# Altium PCB RPi-B-HAT (65 x 56 mm).PcbDoc
Units mm, origin at the board's own origin, x right, y up, seen from the top; angles counter-clockwise.
Board outline 65 x 56 mm, 2 copper layers (Top Layer, Bottom Layer); 8 components, 0 nets, 76 pads, 0 vias.
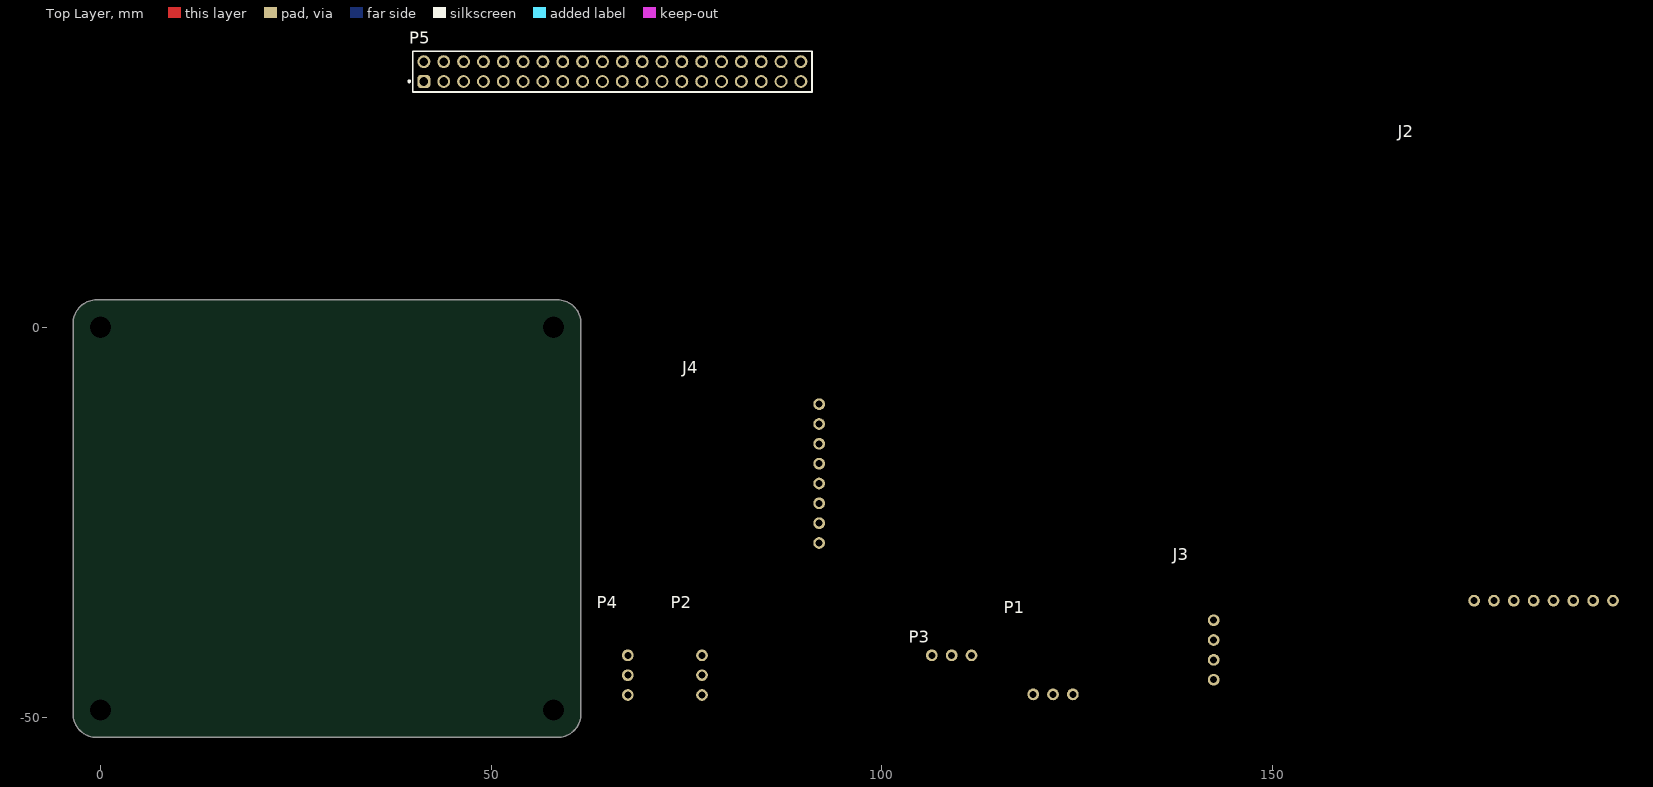
[diagram p0: Top Layer view]
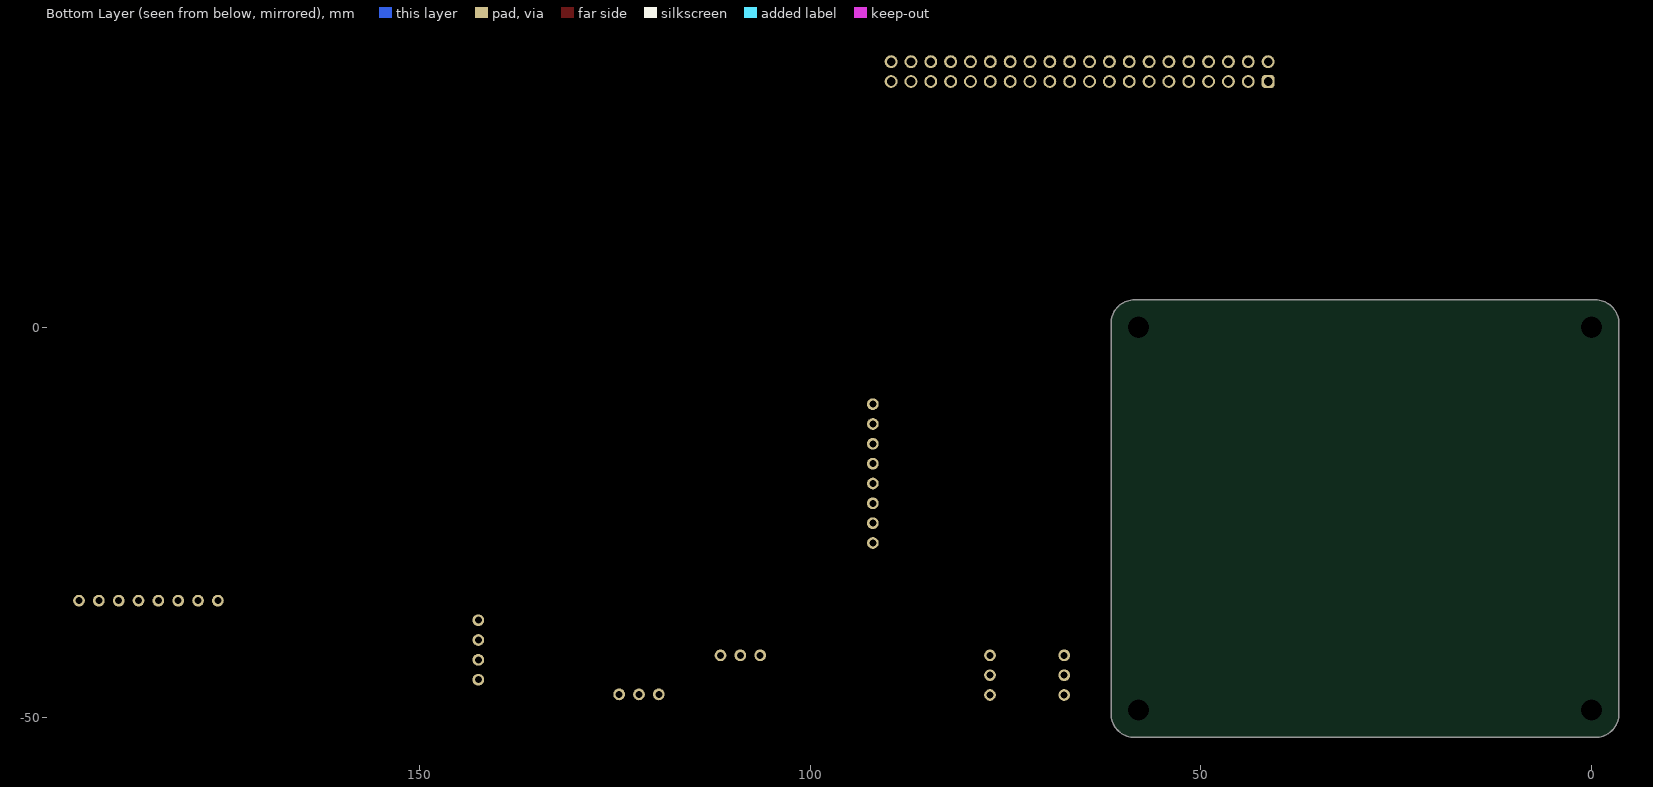
[diagram p1: Bottom Layer view, seen from below]

## Layer stack, top to bottom
Top Solder: solder mask 0.0102, Solder Resist, Dk 3.5
Top Layer: signal copper 0.0356
Dielectric 1: dielectric 0.32, FR-4, Dk 4.8
Bottom Layer: signal copper 0.0356
Bottom Solder: solder mask 0.0102, Solder Resist, Dk 3.5

## Board outline
-3.5,-49.5 ccw(c-0.5,-49.5) -0.5,-52.5 58.5,-52.5 ccw(c58.5,-49.5) 61.5,-49.5 61.5,0.5 ccw(c58.5,0.5) 58.5,3.5 -0.5,3.5 ccw(c-0.5,0.5) -3.5,0.5

## Design rules (kind name [scope] priority, off if disabled: settings)
Clearance [All] p1: gap=0.254 ignorepadtopadclearanceinfootprint=FALSE except(0: Arc-Hole Track-Hole SMDPad-Hole THPad-Hole Via-Hole Fill-Hole Poly-Hole Region-Hole Text-Hole)
PolygonConnect [All] p1: connectstyle=Relief reliefconductorwidth=0.254 reliefentries=4 polygonreliefangle="90 Angle" airgapwidth=0.254
RoutingVias [All] p1: holewidth=0.711 width=1.27 viastyle="Through Hole" minholewidth=0.711 minwidth=1.27 maxholewidth=0.711 maxwidth=1.27
SolderMaskExpansion [All] p1: expansion=0.102 istentingtop=FALSE
Width [All] p1: maxlimit=0.254 minlimit=0.254 preferedwidth=0.254
30 further rules are at their usual default settings.

## Components (designator, comment, footprint, x,y, rotation, side; value= is the part's Value field where it differs from the comment)
J2 "530470810" SPI 1001.34,-27.38 r0 top
J3 "Traffic light" "Traffic light" 142.5,-37.5 r90 top
J4 "ENS160+AHT21" ENS160+AHT21 92,-20 r90 top
P1 "BUZZER" BUZZER 157.5,-47 r0 top
P2 "BUTTON" Button 77,-42 r90 top
P3 "53047-0310" SR505 111.5,-42 r0 top
P4 "BUTTON" Button2 67.5,-42 r90 top
P5 "61304021121" 61304021121 65.53,32.73 r0 top

## Footprints (in the part's own frame and the unit in brackets; to place one, negate y for a bottom-side part, rotate by r counter-clockwise, add the part's x,y. Pads: shape width x height; smd on the part's side, far side on the other; paste and mask are expansions set on the pad)
61304021121 [mm] "Pin Header, pitch 2.54 mm, THT, Vertical, dual row, 40p"
  rrect50% 1.65x1.65 hole 1.1: 1(-24.13,-1.27)
  round 1.65 hole 1.1: 2(-24.13,1.27) 3(-21.59,-1.27) 4(-21.59,1.27) 5(-19.05,-1.27) 6(-19.05,1.27) 7(-16.51,-1.27) 8(-16.51,1.27) 9(-13.97,-1.27) 10(-13.97,1.27) 11(-11.43,-1.27) 12(-11.43,1.27) 13(-8.89,-1.27) 14(-8.89,1.27) 15(-6.35,-1.27) 16(-6.35,1.27) 17(-3.81,-1.27) 18(-3.81,1.27) 19(-1.27,-1.27) 20(-1.27,1.27) 21(1.27,-1.27) 22(1.27,1.27) 23(3.81,-1.27) 24(3.81,1.27) 25(6.35,-1.27) 26(6.35,1.27) 27(8.89,-1.27) 28(8.89,1.27) 29(11.43,-1.27) 30(11.43,1.27) 31(13.97,-1.27) 32(13.97,1.27) 33(16.51,-1.27) 34(16.51,1.27) 35(19.05,-1.27) 36(19.05,1.27) 37(21.59,-1.27) 38(21.59,1.27) 39(24.13,-1.27) 40(24.13,1.27)
  silkscreen extent -26.13,-2.62 25.55,2.62, body extent -25.4,-2.54 25.4,2.54, height 8.59
Button [mm]
  round 1.5 hole 0.9: 41(-5.08,0) 42(-2.54,0) 43(0,0)
  body extent -10.26,-4.23 5.24,4.27, height 17.86
Button2 [mm]
  round 1.5 hole 0.9: 44(-5.08,0) 45(-2.54,0) 46(0,0)
  body extent -10.26,-4.23 5.24,4.27, height 17.86
BUZZER [mm]
  round 1.5 hole 0.9: 1(-38.1,0) 2(-35.56,0) 3(-33.02,0)
  body extent -42.11,-5.37 -29.01,9.63, height 29.97
ENS160+AHT21 [mm]
  round 1.5 hole 0.9: 1(-7.62,0) 2(-5.08,0) 3(-2.54,0) 4(0,0) 5(2.54,0) 6(5.08,0) 7(7.62,0) 8(10.16,0)
  body extent -10.67,-1.55 13.33,17.75, height 2.44
SPI [mm]
  round 1.5 hole 0.9: 1(-825.5,-7.62) 2(-822.96,-7.62) 3(-820.42,-7.62) 4(-817.88,-7.62) 5(-815.34,-7.62) 6(-812.8,-7.62) 7(-810.26,-7.62) 8(-807.72,-7.62)
  body extent -835.53,-9.05 -796.42,50.96, height 4.96
SR505 [mm]
  round 1.5 hole 0.9: 1(-5.08,0) 2(-2.54,0) 3(0,0)
  body extent -8.27,-10.28 2.93,0.88, height 32.86
"Traffic light" [mm]
  round 1.5 hole 0.9: 1(-7.62,0) 2(-5.08,0) 3(-2.54,0) 4(0,0)
  body extent -14.65,-7.78 6.93,5.51, height 55.4

## Part data
J2 J4: Package=None, Availability=Unavailable, MP=530470810, Price=None
J3: "2.50mm Pitch SPOXâ„¢ Wire-to-Board Header, Vertical, Shrouded, 4 Circuits, Tin (Sn) Plating", Package=None, Check_prices=https://www.snapeda.com/parts/22035045/Molex/view-part/?ref=eda, MF=Molex, MP=22035045, SnapEDA_Link=https://www.snapeda.com/parts/22035045/Molex/view-part/?ref=snap
P1 P2 P3 P4: "Connector Header Through Hole 3 position 0.049 (1.25mm)", Package=None, Availability="In Stock", Check_prices=https://www.snapeda.com/parts/53047-0310/Molex/view-part/?ref=eda, MF=Molex, MP=53047-0310, Price=None, SnapEDA_Link=https://www.snapeda.com/parts/53047-0310/Molex/view-part/?ref=snap
P5: library part CMP-1502-01135-4, "WR-PHD Straight Male, PCB Header, Through Hole, 2 Rows, 40 Contacts, 2.54mm Pitch", Color=Black, Contact Resistance=20mΩ, Current Rating=3A, Max Operating Temperature=105°C, Min Operating Temperature=-40°C, Operating Supply Voltage=250V, Connector Type="Male Pin", Contact Material=Gold, Contact Mating Length=5.9944mm, Contact Plating=Gold, Gender=Male, Height=8.89mm, Lead Pitch=2.54mm, Mount="Through Hole", Number of Contacts=40, Number of Pins=40, Number of Positions=40, Number of Rows=2, Orientation=Vertical, Packaging=Bulk, Pitch=2.54mm, RoHS=Compliant, Row Spacing=2.54mm, Termination=Solder, Voltage Rating=250V

## Free pads (board coordinates)
  round 0 hole 2.7: 2(0,-49) 2(0,0) 2(58,-49) 2(58,0)

## Nets (pads, with @x,y where several pads share a name; then routed paths per layer and width w, separated by ;. In a path a pad name is that pad's centre, name@x,y a point inside that pad or via, vN(x,y) a via of type N, cw(c..) or ccw(c..) an arc to the next point about the centre after c; other vN are vias at no path point)
pads on no net: J2.1 J2.2 J2.3 J2.4 J2.5 J2.6 J2.7 J2.8 J3.1 J3.2 J3.3 J3.4 J4.1 J4.2 J4.3 J4.4 J4.5 J4.6 J4.7 J4.8 P1.1 P1.2 P1.3 P2.41 P2.42 P2.43 P3.1 P3.2 P3.3 P4.44 P4.45 P4.46 P5.1 P5.2 P5.3 P5.4 P5.5 P5.6 P5.7 P5.8 P5.9 P5.10 P5.11 P5.12 P5.13 P5.14 P5.15 P5.16 P5.17 P5.18 P5.19 P5.20 P5.21 P5.22 P5.23 P5.24 P5.25 P5.26 P5.27 P5.28 P5.29 P5.30 P5.31 P5.32 P5.33 P5.34 P5.35 P5.36 P5.37 P5.38 P5.39 P5.40

## Other copper
Top Layer:
  pour cut-out: 0,-52.5 cw(c0,-49) -3.5,-49 cw(c0,-49) 0,-45.5 cw(c0,-49) 3.5,-49 cw(c0,-49)
  pour cut-out: 58,-52.5 cw(c58,-49) 54.5,-49 cw(c58,-49) 58,-45.5 cw(c58,-49) 61.5,-49 cw(c58,-49)
  pour cut-out: 58,-3.5 cw(c58,0) 54.5,0 cw(c58,0) 58,3.5 cw(c58,0) 61.5,0 cw(c58,0)
  pour cut-out: 0,-3.5 cw(c0,0) -3.5,0 cw(c0,0) 0,3.5 cw(c0,0) 3.5,0 cw(c0,0)
Bottom Layer:
  pour cut-out: 0,-52.5 cw(c0,-49) -3.5,-49 cw(c0,-49) 0,-45.5 cw(c0,-49) 3.5,-49 cw(c0,-49)
  pour cut-out: 58,-52.5 cw(c58,-49) 54.5,-49 cw(c58,-49) 58,-45.5 cw(c58,-49) 61.5,-49 cw(c58,-49)
  pour cut-out: 58,-3.5 cw(c58,0) 54.5,0 cw(c58,0) 58,3.5 cw(c58,0) 61.5,0 cw(c58,0)
  pour cut-out: 0,-3.5 cw(c0,0) -3.5,0 cw(c0,0) 0,3.5 cw(c0,0) 3.5,0 cw(c0,0)

## Silkscreen, mask and mechanical layers (free items; w line width, h text height)
Top Solder:
  drawing of 16 lines, arcs and shapes, not listed
Bottom Solder:
  circle w0.254: c0,-49 r2.5
  circle w0.254: c58,-49 r2.5
  circle w0.254: c58,0 r2.5
  circle w0.254: c0,0 r2.5
  region: 60.55,0 60.3,-1 59.75,-1.8 59,-2.3 58.05,-2.5 57,-2.3 56.25,-1.8 55.7,-1 55.55,0 55.7,1 56.25,1.7 57,2.3 58.05,2.5 59,2.3 59.75,1.7 60.3,1
  region: 2.55,-49 2.3,-50 1.75,-50.8 1,-51.3 0.05,-51.5 -1,-51.3 -1.75,-50.8 -2.3,-50 -2.45,-49 -2.3,-48 -1.75,-47.3 -1,-46.7 0.05,-46.5 1,-46.7 1.75,-47.3 2.3,-48
  region: 60.55,-49 60.3,-50 59.75,-50.8 59,-51.3 58.05,-51.5 57,-51.3 56.25,-50.8 55.7,-50 55.55,-49 55.7,-48 56.25,-47.3 57,-46.7 58.05,-46.5 59,-46.7 59.75,-47.3 60.3,-48
  region: 2.55,0 2.3,-1 1.75,-1.8 1,-2.3 0.05,-2.5 -1,-2.3 -1.75,-1.8 -2.3,-1 -2.45,0 -2.3,1 -1.75,1.7 -1,2.3 0.05,2.5 1,2.3 1.75,1.7 2.3,1
Mechanical 1:
  the board outline again, w0.254
Mechanical 3:
  lines w0.254: -3.5,-49 -3.5,-34 cw(c-2.5,-34) -2.5,-33 0.5,-33 ccw(c0.5,-32) 1.5,-32 1.5,-17 ccw(c0.5,-17) 0.5,-16 -2.5,-16 cw(c-2.5,-15) -3.5,-15 -3.5,0 ; 28,0 30,0 ; 28,0 28,0 ; 28,0 29,1 ; 28,0 29,-1 ; 29,-1 29,1 ; 29,-1 30,0 ; 29,1 29,1 ; 29,1 30,0 ; 40.5,-48.5 ccw(c41.5,-48.5) 41.5,-49.5 ccw(c41.5,-48.5) 42.5,-48.5 42.5,-33.5 ccw(c41.5,-33.5) 41.5,-32.5 ccw(c41.5,-33.5) 40.5,-33.5 40.5,-48.5
  text "GPIO" at 26.5,-3.5 h1.52

## Dimensions
0,0 to -3.5,0.5 on Mechanical 3
0,0 to -0.5,3.5 on Mechanical 3
-0.5,3.5 to -0.5,-52.5 on Mechanical 3
61.5,0.5 to -3.5,0.5 on Mechanical 3